# Altium PCB Drone_Charge_PCB.PcbDoc
Units mil, origin at the board's own origin, x right, y up, seen from the top; angles counter-clockwise.
Board outline 747.74 x 354.33 mil, 2 copper layers (Top Layer, Bottom Layer), stack 61.811 mil thick; 1 components, 1 nets, 5 pads, 0 vias.
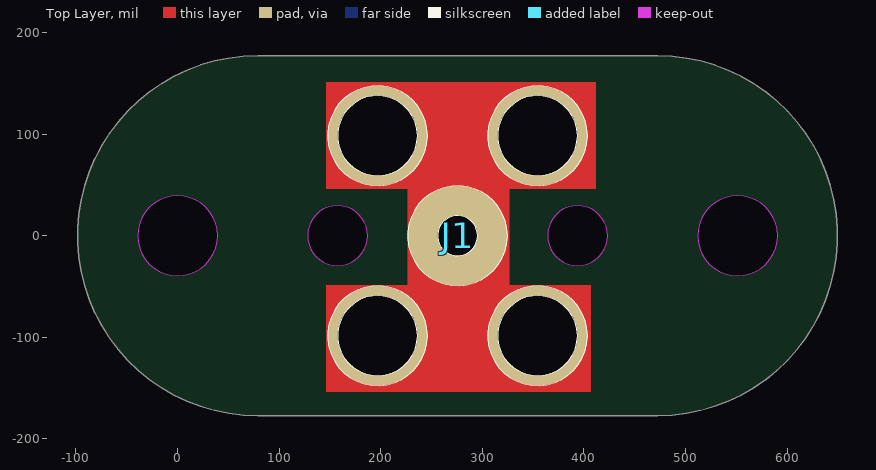
[diagram p0: Top Layer view]
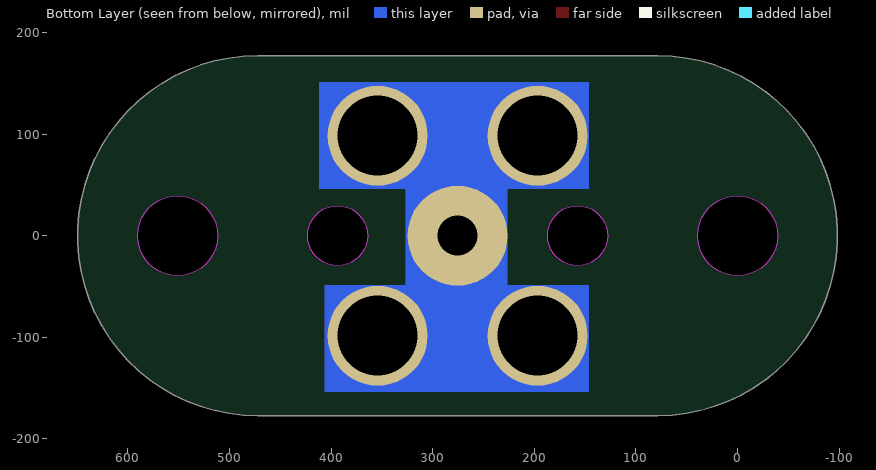
[diagram p1: Bottom Layer view, seen from below]

## Layer stack, top to bottom
Top Solder: solder mask 0.3937, Solder Resist, Dk 3.5
Top Layer: signal copper 1.378
Dielectric 1: dielectric 59.0551, FR-4, Dk 4.8
Bottom Layer: signal copper 1.378
Bottom Solder: solder mask 0.3937, Solder Resist, Dk 3.5

## Board outline
78.74,-177.17 cw(c78.74,0) 78.74,177.17 472.44,177.17 cw(c472.44,0) 472.44,-177.17
cut-out: -39.37,0 ccw(c0,0) 0,-39.37 ccw(c0,0) 39.37,0 ccw(c0,0) 0,39.37 ccw(c0,0)
cut-out: 127.95,0 ccw(c157.48,0) 157.48,-29.53 ccw(c157.48,0) 187.01,0 ccw(c157.48,0) 157.48,29.53 ccw(c157.48,0)
cut-out: 364.17,0 ccw(c393.7,0) 393.7,-29.53 ccw(c393.7,0) 423.23,0 ccw(c393.7,0) 393.7,29.53 ccw(c393.7,0)
cut-out: 511.81,0 ccw(c551.18,0) 551.18,-39.37 ccw(c551.18,0) 590.55,0 ccw(c551.18,0) 551.18,39.37 ccw(c551.18,0)

## Design rules (kind name [scope] priority, off if disabled: settings)
BoardOutlineClearance [All] p1: gap=0 ignorepadtopadclearanceinfootprint=FALSE except(10: Poly-OutlineEdge)
Clearance [All] p1: gap=10 ignorepadtopadclearanceinfootprint=FALSE except(0: Arc-Hole Track-Hole SMDPad-Hole THPad-Hole Via-Hole Fill-Hole Poly-Hole Region-Hole Text-Hole)
HoleToHoleClearance [All] p1: gap=0 allowstackedmicrovias=TRUE
MinimumSolderMaskSliver [All] p1: minsoldermaskwidth=0
PolygonConnect [All] p1: connectstyle=Relief reliefconductorwidth=10 reliefentries=4 polygonreliefangle="90 Angle" airgapwidth=10
RoutingVias [All] p1: holewidth=28 width=50 viastyle="Through Hole" minholewidth=28 minwidth=50 maxholewidth=28 maxwidth=50
SilkToSilkClearance [All] p1: silktosilkclearance=0
SilkToSolderMaskClearance [IsPad] p1: minsilkscreentomaskgap=0 clearancetoexposedcopper=TRUE
SolderMaskExpansion [All] p1: expansion=4 istentingtop=FALSE
Width [All] p1: maxlimit=100 minlimit=10 preferedwidth=10
26 further rules are at their usual default settings.

## Components (designator, comment, footprint, x,y, rotation, side; value= is the part's Value field where it differs from the comment)
J1 "Garnet Shards Type Battery Connector" "Garnet Shards Type Battery Connector" 275.59,0 r180 top locked

## Footprints (in the part's own frame and the unit in brackets; to place one, negate y for a bottom-side part, rotate by r counter-clockwise, add the part's x,y. Pads: shape width x height; smd on the part's side, far side on the other; paste and mask are expansions set on the pad)
"Garnet Shards Type Battery Connector" [mm]
  round 2.5 hole 2: MH1(-2,2.5) MH2(2,2.5) MH3(2,-2.5) MH4(-2,-2.5)
  round 2.5 hole 1: MH5(0,0)
  silkscreen extent -3.25,-3.75 3.25,3.75

## Nets (pads, with @x,y where several pads share a name; then routed paths per layer and width w, separated by ;. In a path a pad name is that pad's centre, name@x,y a point inside that pad or via, vN(x,y) a via of type N, cw(c..) or ccw(c..) an arc to the next point about the centre after c; other vN are vias at no path point)
VCC: J1.MH1 J1.MH2 J1.MH3 J1.MH4 J1.MH5

## Other copper
Top Layer:
  region net VCC: 146.5,151.22 146.5,46.22 226.5,46.22 226.5,-48.78 146.5,-48.78 146.5,-153.78 406.5,-153.78 406.5,-48.78 326.5,-48.78 326.5,46.22 411.5,46.22 411.5,151.22
Bottom Layer:
  region net VCC: 146.5,151.22 146.5,46.22 226.5,46.22 226.5,-48.78 146.5,-48.78 146.5,-153.78 406.5,-153.78 406.5,-48.78 326.5,-48.78 326.5,46.22 411.5,46.22 411.5,151.22

## Silkscreen, mask and mechanical layers (free items; w line width, h text height)
Board_Outline:
  circle w5: c551.18,0 r39.37
  circle w5: c0,0 r39.37
  circle w5: c157.48,0 r29.53
  circle w5: c393.7,0 r29.53
  lines w5: 78.74,-177.17 cw(c78.74,0) 78.74,177.17 472.44,177.17 cw(c472.44,0) 472.44,-177.17 78.74,-177.17
Fabrication:
  drawing of 191 lines, arcs and shapes, not listed
  text "Layer" at 775.09,75 h60
  text "Name" at 1185,75 h60
  text "Material" at 2114.74,75 h60
  text "Thickness" at 2974.51,75 h60
  text "Constant" at 3624.35,75 h60
  text "Board Layer Stack" at 4194.21,75 h60
  text "Top Overlay" at 1185,-45 h60
  text "Top Solder" at 1185,-165 h60
  text "Solder Resist" at 2114.74,-165 h60
  text "0.39mil" at 2974.51,-165 h60
  text "3.5" at 3624.35,-165 h60
  text "1" at 775.09,-285 h60
  text "Top Layer" at 1185,-285 h60
  text "1.38mil" at 2974.51,-285 h60
  text "Dielectric 1" at 1185,-405 h60
  text "FR-4" at 2114.74,-405 h60
  text "59.06mil" at 2974.51,-405 h60
  text "4.8" at 3624.35,-405 h60
  text "2" at 775.09,-525 h60
  text "Bottom Layer" at 1185,-525 h60
  text "1.38mil" at 2974.51,-525 h60
  text "Bottom Solder" at 1185,-645 h60
  text "Solder Resist" at 2114.74,-645 h60
  text "0.39mil" at 2974.51,-645 h60
  text "3.5" at 3624.35,-645 h60
  text "Bottom Overlay" at 1185,-765 h60
  text "Total board thickness:" at 775.09,-885 h60
  text "62.60mil" at 2974.51,-885 h60
Drill Drawing:
  circle w10: c785.62,430.83 r33.33
  lines w10: 752.29,547.5 818.96,547.5 818.96,614.17 752.29,614.17 752.29,547.5
  lines w15: 692.5,352.5 13336.98,352.5 ; 692.5,652.5 13336.98,652.5 ; 1243.38,202.5 1243.38,802.5 ; 1723.26,202.5 1723.26,802.5 ; 2822.94,202.5 2822.94,802.5 ; 3328.81,202.5 3328.81,802.5 ; 4062.61,202.5 4062.61,802.5 ; 5562.16,202.5 5562.16,802.5 ; 6152.01,202.5 6152.01,802.5 ; 6897.81,202.5 6897.81,802.5 ; 7547.64,202.5 7547.64,802.5 ; 8401.4,202.5 8401.4,802.5 ; 9735.01,202.5 9735.01,802.5 ; 11068.62,202.5 11068.62,802.5 ; 11934.38,202.5 11934.38,802.5 ; 692.5,202.5 13336.98,202.5 13336.98,802.5 692.5,802.5 692.5,202.5
  text "Symbol" at 782.5,697.5 h72
  text "Count" at 1288.38,697.5 h72
  text "Hole Size" at 1768.26,697.5 h72
  text "Plated" at 2867.94,697.5 h72
  text "Hole Type" at 3373.81,697.5 h72
  text "Drill Layer Pair" at 4107.61,697.5 h72
  text "Via/Pad" at 5607.16,697.5 h72
  text "Pad Shape" at 6197.01,697.5 h72
  text "Template" at 6942.81,697.5 h72
  text "Description" at 7592.64,697.5 h72
  text "Hole Tolerance (+)" at 8446.4,697.5 h72
  text "Hole Tolerance (-)" at 9780.01,697.5 h72
  text "Hole Length" at 11113.62,697.5 h72
  text "Routed Path Length" at 11979.38,697.5 h72
  text "1" at 1288.38,547.5 h60
  text "39.37mil (1.000mm)" at 1768.26,547.5 h60
  text "PTH" at 2867.94,547.5 h60
  text "Round" at 3373.81,547.5 h60
  text "Top Layer - Bottom Layer" at 4107.61,547.5 h60
  text "Pad" at 5607.16,547.5 h60
  text "Rounded" at 6197.01,547.5 h60
  text "c250h100" at 6942.81,547.5 h60
  text "-" at 11113.62,547.5 h60
  text "-" at 11979.38,547.5 h60
  text "4" at 1288.38,397.5 h60
  text "78.74mil (2.000mm)" at 1768.26,397.5 h60
  text "PTH" at 2867.94,397.5 h60
  text "Round" at 3373.81,397.5 h60
  text "Top Layer - Bottom Layer" at 4107.61,397.5 h60
  text "Pad" at 5607.16,397.5 h60
  text "Rounded" at 6197.01,397.5 h60
  text "c250h200" at 6942.81,397.5 h60
  text "-" at 11113.62,397.5 h60
  text "-" at 11979.38,397.5 h60
  text "5 Total" at 1288.38,247.5 h60

## Dimensions
80,180 to 78.74,-177.17 on Dimension
-98.43,0 to 649.61,0 on Dimension